# Altium PCB SPSU.PcbDoc
Units mil, origin at the board's own origin, x right, y up, seen from the top; angles counter-clockwise.
Board outline 1757.74 x 2141.82 mil, 2 copper layers (Top, Bottom); 44 components, 39 nets, 162 pads, 320 vias.
Unrouted connection lines stored in the file: 2.
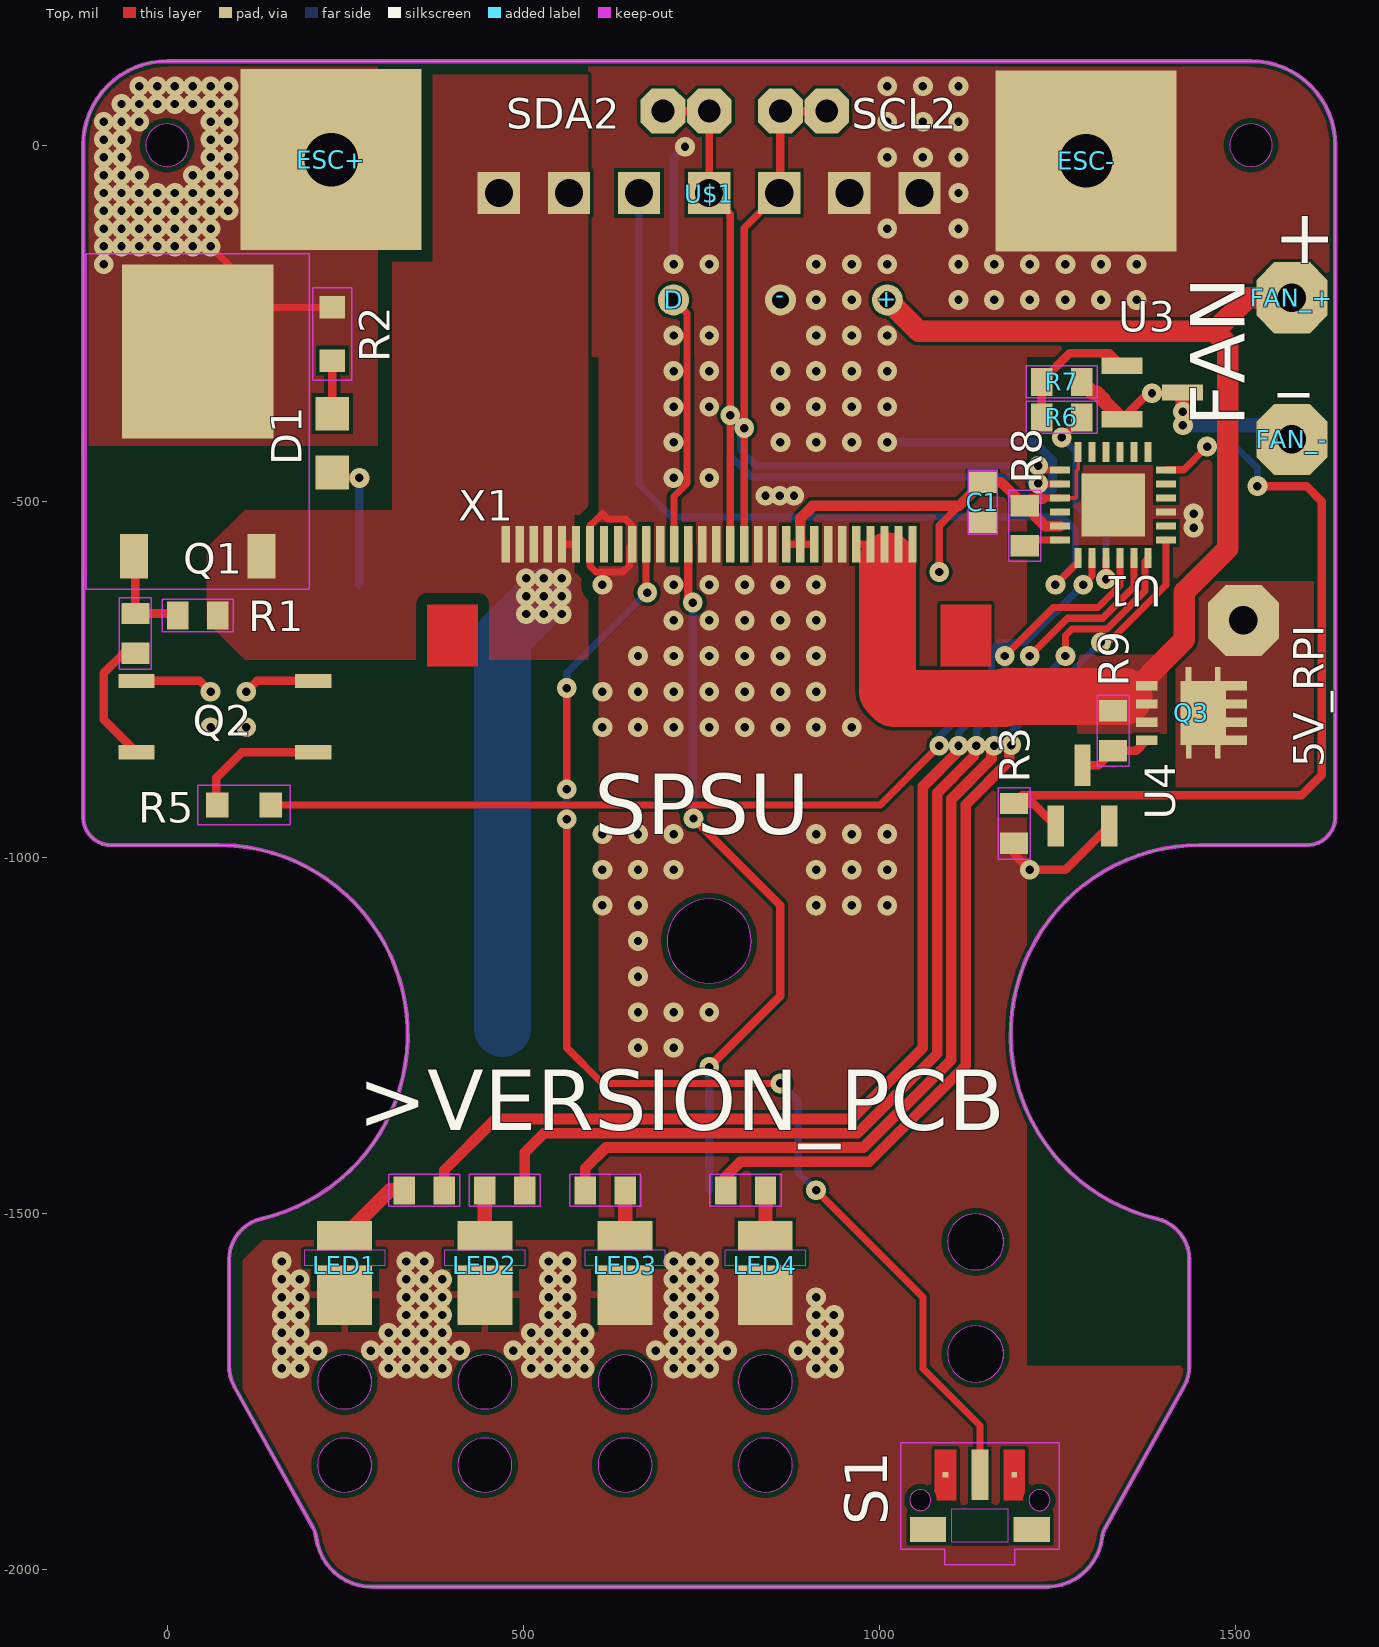
[diagram p0: Top view]
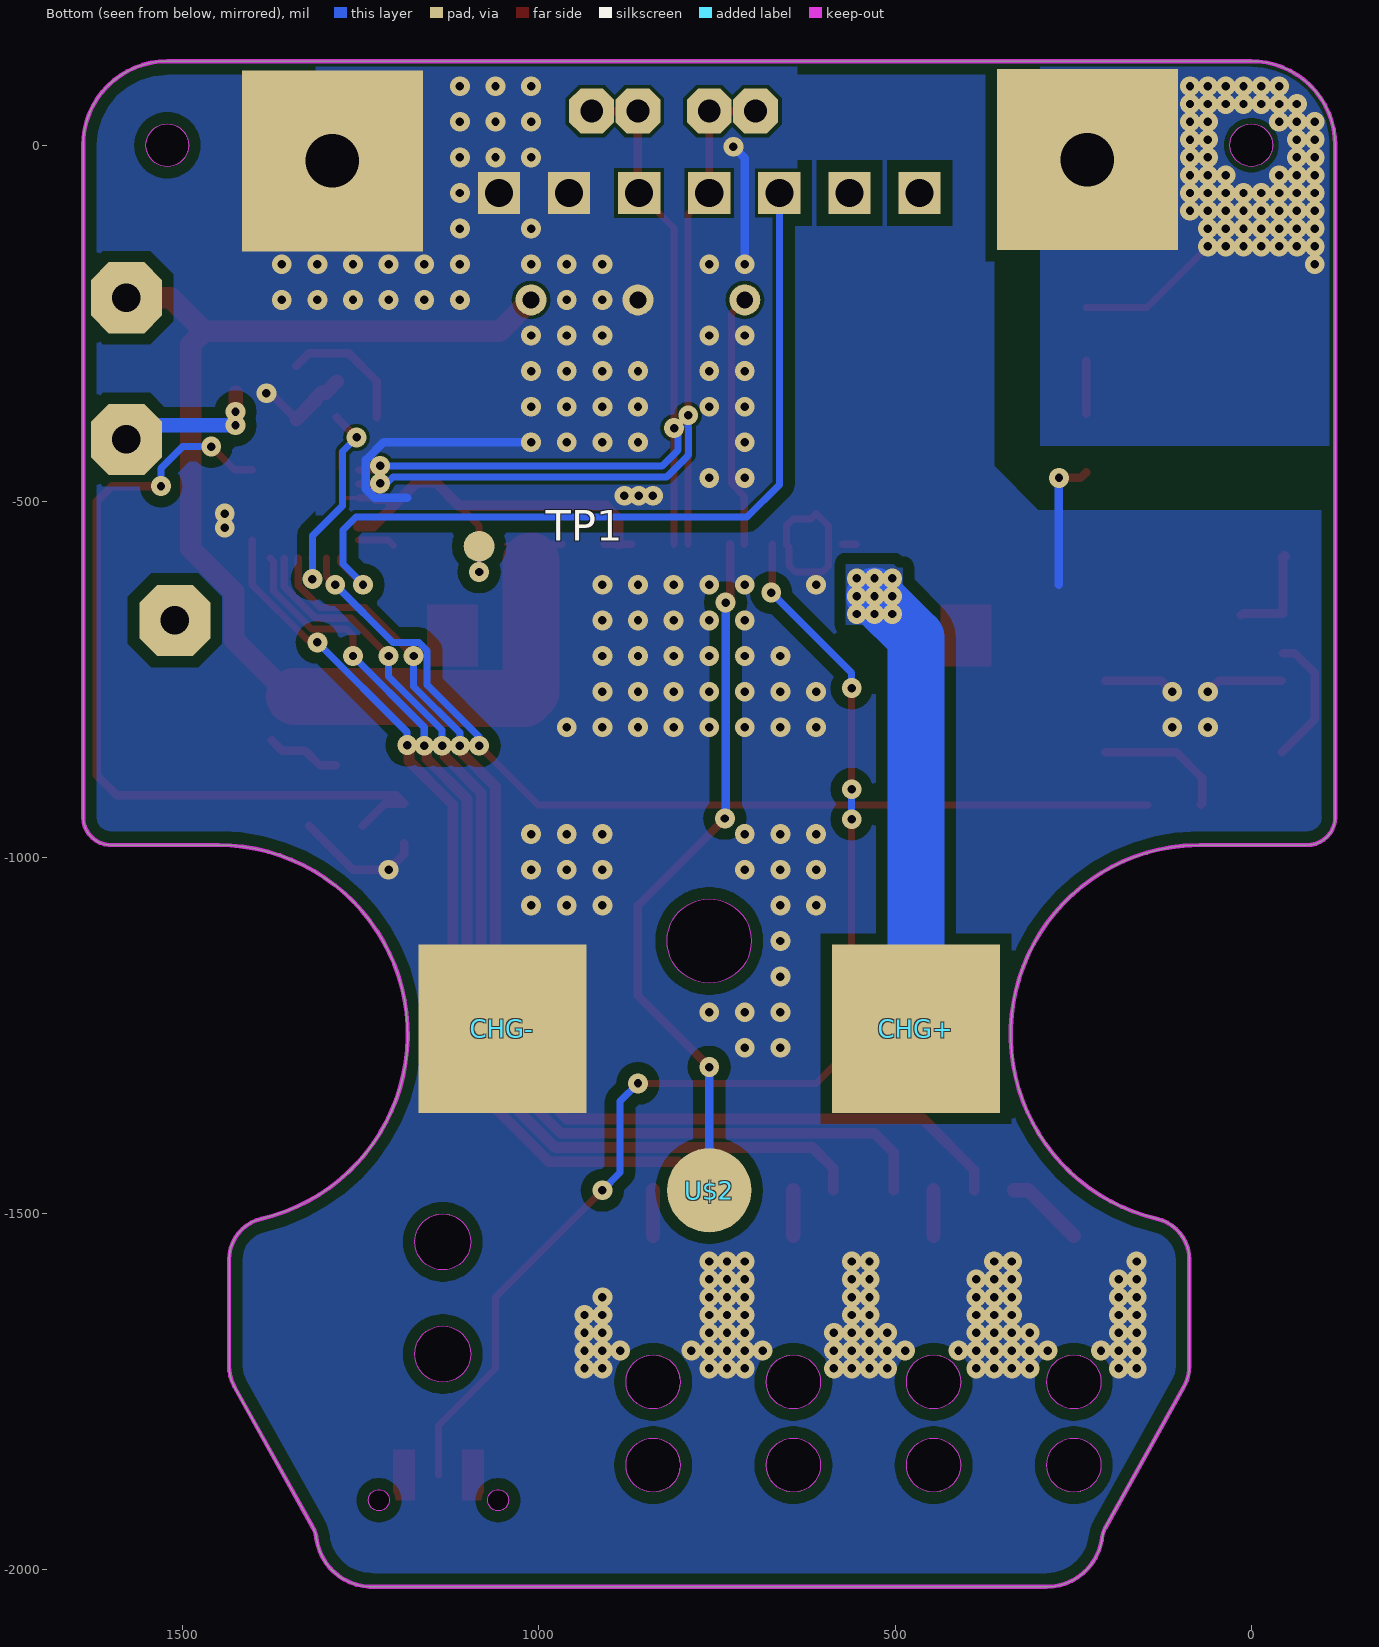
[diagram p1: Bottom view, seen from below]

## Layer stack, top to bottom
Top Solder: solder mask 0.4, Solder Resist, Dk 3.5
Top: signal copper 1.378
Dielectric 1: dielectric 12.6, FR-4, Dk 4.8
Bottom: signal copper 1.378
Bottom Solder: solder mask 0.4, Solder Resist, Dk 3.5

## Board outline
1313.4,-1950.24 1312.71,-1953.6 1312.52,-1954.94 cw(c1234.4,-1945.12) 1238.29,-2023.76 1234.39,-2023.86 287.67,-2023.86 cw(c287.67,-1945.12) 211.61,-1965.5 210.12,-1958.8 209.54,-1954.94 208.1,-1948.23 206.94,-1945 205.51,-1941.88 204.87,-1940.69 94.44,-1742.51 cw(c146.03,-1713.76) 86.97,-1713.76 86.97,-1564.54 cw(c146.02,-1564.54) 132.57,-1507.04 ccw(c72.05,-1248.28) 95.21,-983.54 72.05,-982.52 -78.47,-982.52 cw(c-78.47,-943.15) -117.84,-943.15 -117.84,-0.15 cw(c0.27,-0.14) -10.03,117.52 0.27,117.96 1521.79,117.96 cw(c1521.8,-0.15) 1639.46,10.15 1639.9,-0.15 1639.9,-943.15 cw(c1600.53,-943.15) 1603.97,-982.37 1600.53,-982.52 1450.01,-982.52 ccw(c1450.01,-1248.27) 1389.49,-1507.04 cw(c1376.04,-1564.54) 1435.09,-1564.54 1435.09,-1713.76 cw(c1376.03,-1713.76) 1427.62,-1742.51 1317.19,-1940.69 ccw(c1351.56,-1959.88) 1314.38,-1946.95
cut-out: 761.03,-1176.22 ccw(c761.03,-1117.17) 820.08,-1117.17 ccw(c761.03,-1117.17) 761.03,-1058.11 ccw(c761.03,-1117.17) 701.98,-1117.17 ccw(c761.03,-1117.17)
cut-out: 1135.05,-1578.89 ccw(c1135.05,-1539.52) 1174.42,-1539.52 ccw(c1135.05,-1539.52) 1135.05,-1500.15 ccw(c1135.05,-1539.52) 1095.68,-1539.52 ccw(c1135.05,-1539.52)
cut-out: 1135.05,-1736.37 ccw(c1135.05,-1697) 1174.42,-1697 ccw(c1135.05,-1697) 1135.05,-1657.63 ccw(c1135.05,-1697) 1095.68,-1697 ccw(c1135.05,-1697)
cut-out: 642.92,-1774.06 ccw(c642.92,-1736.07) 680.91,-1736.07 ccw(c642.92,-1736.07) 642.92,-1698.08 ccw(c642.92,-1736.07) 604.93,-1736.07 ccw(c642.92,-1736.07)
cut-out: 446.07,-1890.99 ccw(c446.07,-1853) 484.06,-1853 ccw(c446.07,-1853) 446.07,-1815.01 ccw(c446.07,-1853) 408.08,-1853 ccw(c446.07,-1853)
cut-out: 642.92,-1890.99 ccw(c642.92,-1853) 680.91,-1853 ccw(c642.92,-1853) 642.92,-1815.01 ccw(c642.92,-1853) 604.93,-1853 ccw(c642.92,-1853)
cut-out: 839.77,-1774.06 ccw(c839.77,-1736.07) 877.76,-1736.07 ccw(c839.77,-1736.07) 839.77,-1698.08 ccw(c839.77,-1736.07) 801.78,-1736.07 ccw(c839.77,-1736.07)
cut-out: 839.77,-1890.99 ccw(c839.77,-1853) 877.76,-1853 ccw(c839.77,-1853) 839.77,-1815.01 ccw(c839.77,-1853) 801.78,-1853 ccw(c839.77,-1853)
cut-out: 249.22,-1774.06 ccw(c249.22,-1736.07) 287.21,-1736.07 ccw(c249.22,-1736.07) 249.22,-1698.08 ccw(c249.22,-1736.07) 211.23,-1736.07 ccw(c249.22,-1736.07)
cut-out: 446.07,-1774.06 ccw(c446.07,-1736.07) 484.06,-1736.07 ccw(c446.07,-1736.07) 446.07,-1698.08 ccw(c446.07,-1736.07) 408.08,-1736.07 ccw(c446.07,-1736.07)
cut-out: 249.22,-1890.99 ccw(c249.22,-1853) 287.21,-1853 ccw(c249.22,-1853) 249.22,-1815.01 ccw(c249.22,-1853) 211.23,-1853 ccw(c249.22,-1853)
cut-out: 1521.68,-30.11 ccw(c1521.68,-0.11) 1551.68,-0.11 ccw(c1521.68,-0.11) 1521.68,29.89 ccw(c1521.68,-0.11) 1491.68,-0.11 ccw(c1521.68,-0.11)
cut-out: 0,-30 ccw(c0,0) 30,0 ccw(c0,0) 0,30 ccw(c0,0) -30,0 ccw(c0,0)
cut-out: 1224.69,-1916.93 ccw(c1224.69,-1902.17) 1239.46,-1902.17 ccw(c1224.69,-1902.17) 1224.69,-1887.4 ccw(c1224.69,-1902.17) 1209.93,-1902.17 ccw(c1224.69,-1902.17)
cut-out: 1057.37,-1916.93 ccw(c1057.37,-1902.17) 1072.13,-1902.17 ccw(c1057.37,-1902.17) 1057.37,-1887.4 ccw(c1057.37,-1902.17) 1042.61,-1902.17 ccw(c1057.37,-1902.17)

## Design rules (kind name [scope] priority, off if disabled: settings)
BoardOutlineClearance mdCopperDimension [All] p1: gap=10 ignorepadtopadclearanceinfootprint=FALSE except(0: Arc-SplitContinuation Track-SplitContinuation SMDPad-SplitContinuation THPad-SplitContinuation Via-SplitContinuation Fill-SplitContinuation Poly-SplitContinuation Region-SplitContinuation Text-SplitContinuation; 7.87: Poly-OutlineEdge Poly-CavityEdge Poly-CutoutEdge Poly-SplitBarrior)
Clearance Clearance_for_PolygonClass_Isolate_16 [InPolygonClass('Isolate_16') vs IsArc Or IsTrack Or IsPad Or IsVia Or IsFill Or IsRegion Or IsText] p1: gap=16 ignorepadtopadclearanceinfootprint=FALSE
Clearance "Clearance (Same Net)" [All] p2: gap=5 ignorepadtopadclearanceinfootprint=FALSE
Clearance [All] p3: gap=5 ignorepadtopadclearanceinfootprint=FALSE
HoleSize [All] p1: absolutevalues=TRUE maxlimit=100000 minlimit=11.81 maxpercent=80.000 minpercent=20.000
HoleToHoleClearance mdDrill [All] p1: gap=6 allowstackedmicrovias=TRUE
MinimumSolderMaskSliver [All] p1 off: minsoldermaskwidth=10
PasteMaskExpansion Expansion_SMDPaste_OFF [InPadClass('SMDPaste_OFF')] p1: expansion=0
PasteMaskExpansion mlMinCreamFrame [All] p2: expansion=0
PolygonConnect PolygonConnect_For_PolygonThermal_ON_Width100000_Gap100000 [InPolygonClass('PolygonThermal_ON_Width100000_Gap100000') vs Not IsVia] p1: connectstyle=Relief reliefconductorwidth=10 reliefentries=4 polygonreliefangle="90 Angle" airgapwidth=10
PolygonConnect PolygonConnect_For_PolygonThermal_OFF [InPolygonClass('PolygonThermal_OFF')] p2: connectstyle=Direct reliefconductorwidth=10 reliefentries=4 polygonreliefangle="90 Angle" airgapwidth=10
PolygonConnect ThermalVias [IsVia] p3: connectstyle=Direct reliefconductorwidth=10 reliefentries=4 polygonreliefangle="90 Angle" airgapwidth=10
PolygonConnect [All] p4: connectstyle=Relief reliefconductorwidth=10 reliefentries=4 polygonreliefangle="90 Angle" airgapwidth=10
RoutingVias [All] p1: holewidth=11.81 width=17.81 viastyle="Through Hole" minholewidth=11.81 minwidth=17.81 maxholewidth=100 maxwidth=100
SolderMaskExpansion Expansion_SMDSolder_OFF [InPadClass('SMDSolder_OFF')] p1: expansion=0 istentingtop=FALSE
SolderMaskExpansion mlMinStopFrame [All] p2: expansion=4 istentingtop=FALSE
Width [All] p1: maxlimit=10 minlimit=5 preferedwidth=5
26 further rules are at their usual default settings.

## Classes and differential pairs
polygon class PolygonThermal_ON_Width100000_Gap100000: Polygon_3_Net_+12V Polygon_4_Net_0V
polygon class PolygonThermal_OFF: Polygon_1_Net_0V Polygon_1_Net_+5V Polygon_1_Net_+5V_RPI Polygon_1_Net_+12V Polygon_1_Net_ESC_+ Polygon_2_Net_0V Polygon_2_Net_+12V Polygon_2_Net_ESC_+ Polygon_3_Net_0V Polygon_5_Net_0V Polygon_6_Net_0V
polygon class Isolate_16: Polygon_1_Net_+12V Polygon_2_Net_0V Polygon_2_Net_+12V
pad class SMDSolder_OFF: S1-1 S1-3 X1-1 X1-2 X1-3 X1-4 X1-5 X1-6 X1-7 X1-8 X1-9 X1-10 X1-11 X1-12 X1-13 X1-14 X1-15 X1-16 X1-17 X1-18 X1-19 X1-20 X1-21 X1-22 X1-23 X1-24 X1-25 X1-26 X1-27 X1-28 X1-29 X1-30
pad class SMDPaste_OFF: S1-1 S1-3 TP1-TP X1-1 X1-2 X1-3 X1-4 X1-5 X1-6 X1-7 X1-8 X1-9 X1-10 X1-11 X1-12 X1-13 X1-14 X1-15 X1-16 X1-17 X1-18 X1-19 X1-20 X1-21 X1-22 X1-23 X1-24 X1-25 X1-26 X1-27 X1-28 X1-29 X1-30

## Components (designator, comment, footprint, x,y, rotation, side; value= is the part's Value field where it differs from the comment)
5V_RPI "WIREPAD2,54/1,0" 2,54/1,0 1511.03,-667.17 r90 top
+ "" TH-0.75/0.6 1011.03,-217.17 r0 top
- "" TH-0.75/0.6 861.03,-217.17 r0 top
C1 "100nF" C0603 1145.03,-501.32 r90 top
CHG+ "" SMT-PAD_SQ6MM 470.75,-1240.3 r180 bottom
CHG- "" SMT-PAD_SQ6MM 1051.31,-1240.3 r180 bottom
D "" TH-0.75/0.6 711.03,-217.17 r0 top
D1 "" CHIPLED_0805 232.03,-418.17 r180 top
ESC+ "" ESC 230.28,-20.42 r180 top
ESC- "" ESC 1290.03,-22.17 r0 top
FAN_+ "WIREPAD2,54/1,0" 2,54/1,0 1579.03,-214.17 r0 top
FAN_- "WIREPAD2,54/1,0" 2,54/1,0 1579.03,-413.17 r0 top
LED1 "JE2835AWTLED_JE2835_CRW-L" LED_JE2835_CRW-L 249.22,-1582.92 r90 top
LED2 "JE2835AWTLED_JE2835_CRW-L" LED_JE2835_CRW-L 446.07,-1582.92 r90 top
LED3 "JE2835AWTLED_JE2835_CRW-L" LED_JE2835_CRW-L 642.92,-1582.92 r90 top
LED4 "JE2835AWTLED_JE2835_CRW-L" LED_JE2835_CRW-L 839.77,-1582.92 r90 top
Q1 "FDD4141TO252" TO252 43.03,-388.17 r0 top
Q2 "EL357N" EL357N(C)(TA)-VG_EVE-L 81.03,-802.17 r180 top
Q3 "" POWERDI3333-8_3P3X3P3_DIO 1438.03,-797.17 r0 top
R1 "100k" R0603#1 43.03,-660.17 r0 top
R2 "150" R0603#2 232.03,-265.17 r270 top
R3 "100k" R0603#1 1189.03,-952.17 r90 top
R4 "4k7" R0603#1 -44.47,-685.42 r270 top
R5 "200" R0603#2 108.03,-926.17 r180 top
R6 "4k7" R0603#1 1256.03,-382.17 r0 top
R7 "100k" R0603#1 1256.03,-332.17 r180 top
R8 "100k" R0603#1 1204.03,-534.17 r270 top
R9 "100k" R0603#1 1328.03,-822.17 r90 top
R10 "150R" R0603#1 361.03,-1467.17 r0 top
R11 "150R" R0603#1 474.03,-1467.17 r0 top
R12 "150R" R0603#1 615.03,-1467.17 r180 top
R13 "150R" R0603#1 812.03,-1467.17 r180 top
S1 "TL3340AF160QG" SW_TL3340AF160QG 1141.03,-1902.17 r0 top
SCL1 "" 1,6/0,8 861.03,47.83 r0 top
SCL2 "" 1,6/0,8 926.03,47.83 r0 top
SDA1 "" 1,6/0,8 696.03,47.83 r0 top
SDA2 "" 1,6/0,8 761.03,47.83 r0 top
TP1 "TPTP11R" TP11R 1084.03,-563.17 r180 bottom
U1 "PCAL6416AHF,128HWQFN24_PCAL_NXP-L" HWQFN24_PCAL_NXP-L 1328.03,-505.17 r90 top
U3 "2N7002,215TO-236AB_NEX-M" TO-236AB_NEX-M 1383.03,-347.17 r270 top
U4 "" TO-236AB_NEX-M 1285.03,-913.17 r0 top
U$1 "" BATT_CON_THT 761.03,-67.17 r180 top
U$2 "" SMT-PAD_R3MM 761.03,-1467.17 r180 bottom
X1 "FH12-30S-0.5SH" FH12-30S-0.5SH 761.03,-688.17 r0 top

## Footprints (in the part's own frame and the unit in brackets; to place one, negate y for a bottom-side part, rotate by r counter-clockwise, add the part's x,y. Pads: shape width x height; smd on the part's side, far side on the other; paste and mask are expansions set on the pad)
1,6/0,8 [mil] "1,6/0,8"
  oct 63x63 / inner round 58.2 / far side oct 63x63 hole 32: 1(0,0)
2,54/1,0 [mil] "2,54/1,0"
  oct 100x100 / inner round 92.39 / far side oct 100x100 hole 40: 1(0,0)
BATT_CON_THT [mm] "BATT_CON_THT"
  rect 1.508x1.508 / inner round 1.393 / far side rect 1.508x1.508 hole 1: P$1(-7.498,0) P$2(-4.998,0) P$3(-2.498,0) P$4(0.002,0) P$5(2.502,0) P$6(5.002,0) P$7(7.502,0)
C0603 [mil] "C0603"
  rect 30x39.4 smd: 1(-28,0) 2(28,0)
  Top keep-out lines w2: -44.96,20.56 -44.96,-20.56 44.96,-20.56 44.96,20.56 -44.96,20.56
CHIPLED_0805 [mil] "CHIPLED_0805"
  rect 47.24x47.24 smd: A(0,-41.34) C(0,41.34)
EL357N(C)(TA)-VG_EVE-L [mil] "EL357N(C)(TA)-VG_EVE-L"
  rect 51x20 smd: 1(-124,50) 2(-124,-50) 3(124,-50) 4(124,50)
ESC [mil] "ESC"
  rect 254x254 / inner round 234.67 / far side rect 254x254 hole 75: P$1(0,0)
FH12-30S-0.5SH [mil] "FH12-30S-0.5SH"
  rect 11.81x51.18 smd paste+0 mask+0: 1(-285.43,127.95) 2(-265.75,127.95) 3(-246.06,127.95) 4(-226.38,127.95) 5(-206.69,127.95) 6(-187.01,127.95) 7(-167.32,127.95) 8(-147.64,127.95) 9(-127.95,127.95) 10(-108.27,127.95) 11(-88.58,127.95) 12(-68.9,127.95) 13(-49.21,127.95) 14(-29.53,127.95) 15(-9.84,127.95) 16(9.84,127.95) 17(29.53,127.95) 18(49.21,127.95) 19(68.9,127.95) 20(88.58,127.95) 21(108.27,127.95) 22(127.95,127.95) 23(147.64,127.95) 24(167.32,127.95) 25(187.01,127.95) 26(206.69,127.95) 27(226.38,127.95) 28(246.06,127.95) 29(265.75,127.95) 30(285.43,127.95)
  Top region: -324.8,43.31 -324.8,-43.31 -395.67,-43.31 -395.67,43.31
  Top region: 395.67,43.31 395.67,-43.31 324.8,-43.31 324.8,43.31
HWQFN24_PCAL_NXP-L [mil] "HWQFN24_PCAL_NXP-L"
  rect 27.87x10.03 smd: 1(-74.44,49.23) 2(-74.44,29.53) 3(-74.44,9.85) 4(-74.44,-9.85) 5(-74.44,-29.53) 6(-74.44,-49.23) 13(74.44,-49.23) 14(74.44,-29.53) 15(74.44,-9.85) 16(74.44,9.85) 17(74.44,29.53) 18(74.44,49.23)
  rect 10.03x27.87 smd: 7(-49.23,-74.44) 8(-29.53,-74.44) 9(-9.85,-74.44) 10(9.85,-74.44) 11(29.53,-74.44) 12(49.23,-74.44) 19(49.23,74.44) 20(29.53,74.44) 21(9.85,74.44) 22(-9.85,74.44) 23(-29.53,74.44) 24(-49.23,74.44)
  rect 89x89 smd: 25(0,0)
LED_JE2835_CRW-L [mil] "LED_JE2835_CRW-L"
  rect 84x77 smd: 1(-31,0)
  rect 42x77 smd: 2(52,0)
  Top keep-out region: 10,56 32,56 32,-56 10,-56
  Top keep-out region: 10,56 32,56 32,-56 10,-56
POWERDI3333-8_3P3X3P3_DIO [mil] "POWERDI3333-8_3P3X3P3_DIO"
  rect 30x13 smd: 1(-63,38.39) 2(-63,12.8) 3(-63,-12.8) 4(-63,-38.39) 5(63,-38.39) 6(63,-12.8) 7(63,12.8) 8(63,38.39)
  rect 64x90 smd: 9(16.35,0)
  rect 8x20 smd: 10(-4.1,54.9) 11(37,54.9) 12(-4,-54.1) 13(37,-54.1)
R0603#1 [mil] "R0603"
  rect 30x39.4 smd: 1(-28,0) 2(28,0)
  Top keep-out lines w2: -49.96,-22.56 -49.96,22.56 49.96,22.56 49.96,-22.56 -49.96,-22.56
R0603#2 [mil] "R0603"
  rect 31.5x35.43 smd: 1(-37.4,0) 2(37.4,0)
  Top keep-out lines w2: 64.96,-27.56 -64.96,-27.56 -64.96,27.56 64.96,27.56 64.96,-27.56
SMT-PAD_R3MM [mm] "SMT-PAD_R3MM"
  rrect100% 3x3 smd: P$1(0,0)
SMT-PAD_SQ6MM [mm] "SMT-PAD_SQ6MM"
  rect 6x6 smd: P$1(0,0)
SW_TL3340AF160QG [mil] "SW_TL3340AF160QG"
  rect 7.87x7.87 smd paste+0 mask+0: 1(-48.23,35.43) 3(48.23,35.43)
  rect 23.62x70.87 smd: 2(0,35.43)
  rect 51.18x35.43 smd: S1(-72.83,-41.34) S2(72.83,-41.34)
  Top region: 63.19,71.06 33.27,71.06 33.27,-0.19 60.24,-0.19 60.22,0.34 60.24,1.05 60.29,1.74 60.37,2.43 60.42,2.79 60.45,3.14 60.55,3.84 60.67,4.54 60.83,5.22 60.92,5.57 61.02,5.99 61.24,6.83 61.49,7.65 61.8,8.47 61.97,8.88 62.09,9.19 62.36,9.83 62.65,10.44 62.98,11.04 63.19,11.39 63.19,11.81
  Top region: -63.18,71.06 -33.26,71.06 -33.26,-0.19 -60.24,-0.19 -60.22,0.34 -60.24,1.05 -60.29,1.74 -60.37,2.43 -60.42,2.79 -60.45,3.14 -60.55,3.84 -60.67,4.54 -60.83,5.22 -60.92,5.57 -61.02,5.99 -61.24,6.83 -61.49,7.65 -61.8,8.47 -61.97,8.88 -62.09,9.19 -62.36,9.83 -62.65,10.44 -62.98,11.04 -63.18,11.39 -63.18,11.81
  Top keep-out region: -39.37,-59.06 -39.37,-11.81 39.37,-11.81 39.37,-59.06
  Top keep-out region: -39.37,-59.06 -39.37,-11.81 39.37,-11.81 39.37,-59.06
  Top keep-out lines w1.97: -111.22,-68.9 -111.22,80.71 111.22,80.71 111.22,-68.9 49.21,-68.9 49.21,-90.55 -49.21,-90.55 -49.21,-68.9 -111.22,-68.9
TH-0.75/0.6 [mil] "TH-0.75/0.6"
  round 43.62 hole 23.62: P$2(0,0)
TO252 [mm] "TO252"
  rect 1x1.6 smd: 1(-2.28,-4.8) 2(2.28,-4.8)
  rect 5.4x6.2 smd: 3(0,2.5)
  Top keep-out lines w0.051: -3.973,-5.983 -3.973,5.983 3.973,5.983 3.973,-5.983 -3.973,-5.983
TO-236AB_NEX-M [mil] "TO-236AB_NEX-M"
  rect 23x58 smd: 1(-37.5,-42.5) 2(37.5,-42.5) 3(0,42.5)
TP11R [mil] "TP11R"
  rrect100% 43.31x43.31 smd paste+0: TP(0,0)

## Part data
5V_RPI FAN_+ FAN_-: library part 2,54/1,0, PackageName=2,54/1,0
+ - D: library part TH-0.75/0.6, PackageName=TH-0.75/0.6
C1: library part C0603, PackageName=C0603
CHG+ CHG-: library part SMT-PAD_SQ6MM, PackageName=SMT-PAD_SQ6MM
D1: library part CHIPLED_0805, PackageName=CHIPLED_0805
ESC+ ESC-: library part ESC, PackageName=ESC
LED1 LED2 LED3 LED4: library part LED_JE2835_CRW-L, PackageName=LED_JE2835_CRW-L
Q1: library part TO252, PackageName=TO252
Q2: library part EL357N(C)(TA)-VG_EVE-L, PackageName=EL357N(C)(TA)-VG_EVE-L
Q3: library part POWERDI3333-8_3P3X3P3_DIO, PackageName=POWERDI3333-8_3P3X3P3_DIO
R1 R2 R3 R4 R5 R6 R7 R8 R9 R10 R11 R12 R13: library part R0603, PackageName=R0603
S1: library part SW_TL3340AF160QG, PackageName=SW_TL3340AF160QG
SCL1 SCL2 SDA1 SDA2: library part 1,6/0,8, PackageName=1,6/0,8
TP1: library part TP11R, PackageName=TP11R
U1: library part HWQFN24_PCAL_NXP-L, PackageName=HWQFN24_PCAL_NXP-L
U3 U4: library part TO-236AB_NEX-M, PackageName=TO-236AB_NEX-M
U$1: library part BATT_CON_THT, PackageName=BATT_CON_THT
U$2: library part SMT-PAD_R3MM, PackageName=SMT-PAD_R3MM
X1: PackageName=FH12-30S-0.5SH

## Free pads (board coordinates)
  round 75.98 hole 75.98 unplated: MH1(839.77,-1853) MH2(839.77,-1736.07) MH3(249.22,-1736.07) MH4(249.22,-1853) MH5(446.07,-1736.07) MH6(642.92,-1853) MH7(642.92,-1736.07) MH8(446.07,-1853)
  round 29.53 hole 29.53 unplated: MH1(1057.37,-1902.17) MH2(1224.69,-1902.17)
  round 78.74 hole 78.74 unplated: MH9(1135.05,-1539.52) MH10(1135.05,-1697)
  round 60 hole 60 unplated: MH11(0,0) MH12(1521.68,-0.11)
  round 118.11 hole 118.11 unplated: MH13(761.03,-1117.17)

## Via types
v1: diameter 27.81/27.81 (per signal layer), hole 11.81, Top to Bottom, 320 vias

## Nets (pads, with @x,y where several pads share a name; then routed paths per layer and width w, separated by ;. In a path a pad name is that pad's centre, name@x,y a point inside that pad or via, vN(x,y) a via of type N, cw(c..) or ccw(c..) an arc to the next point about the centre after c; other vN are vias at no path point)
0V: -.P$2 C1.1 CHG-.P$1 D1.C ESC-.P$1 LED1.1 LED2.1 LED3.1 LED4.1 Q2.2 Q2.3 R3.1 R7.1 S1.1 S1.3 U1.9 U1.25 U3.2 U4.2 U$1.P$1 U$1.P$2 X1.7 X1.10 X1.12 X1.15 X1.16 X1.19 X1.20 X1.24 X1.25 | length 1489
  Top w10: 593.71,-590.85 602.03,-599.17 639.76,-599.17 648.98,-589.95 648.98,-564 X1.10 652.76,-534.26 643.12,-524.63 618.49,-524.63 611.03,-517.17 603.57,-524.63 603.34,-524.63 593.71,-534.26 X1.7 593.71,-590.85
  Top w12: Q2.3 46.03,-752.17 v1(61.03,-767.17) ; v1(111.03,-767.17) 126.03,-752.17 Q2.2 ; D1.C 239.69,-467.17 v1(270.03,-467.17) ; R3.1 1189.03,-995.17 v1(1211.03,-1017.17) 1261.03,-1017.17 U4.2 ; U3.2 1377.03,-348.17 v1(1382.62,-348.17)
  Top w20: R7.1 1299.33,-347.47 1305.24,-347.47 1314.03,-356.26 1314.03,-358.17 U3.2
  Bottom w12: 270.03,-617.17 v1(270.03,-467.17) ; v1(711.03,-167.17) 711.03,-18.17 v1(727.03,-2.17) ; v1(1011.03,-417.17) 1218.18,-417.17 1242.94,-441.92 1242.94,-483.1 1231.28,-494.76 1184.62,-494.76
  other v1: 161.03,-1717.17 186.03,-1717.17 311.03,-1717.17 336.03,-1717.17 361.03,-1717.17 386.03,-1717.17 511.03,-1717.17 536.03,-1717.17 561.03,-1717.17 586.03,-1717.17 711.03,-1717.17 736.03,-1717.17 761.03,-1717.17 911.03,-1717.17 936.03,-1717.17 161.03,-1692.17 186.03,-1692.17 211.03,-1692.17 286.03,-1692.17 311.03,-1692.17 336.03,-1692.17 361.03,-1692.17 386.03,-1692.17 411.03,-1692.17 486.03,-1692.17 511.03,-1692.17 536.03,-1692.17 561.03,-1692.17 586.03,-1692.17 686.03,-1692.17 711.03,-1692.17 736.03,-1692.17 761.03,-1692.17 786.03,-1692.17 886.03,-1692.17 911.03,-1692.17 936.03,-1692.17 161.03,-1667.17 186.03,-1667.17 311.03,-1667.17 336.03,-1667.17 361.03,-1667.17 386.03,-1667.17 511.03,-1667.17 536.03,-1667.17 561.03,-1667.17 586.03,-1667.17 711.03,-1667.17 736.03,-1667.17 761.03,-1667.17 911.03,-1667.17 936.03,-1667.17 161.03,-1642.17 186.03,-1642.17 336.03,-1642.17 361.03,-1642.17 386.03,-1642.17 536.03,-1642.17 561.03,-1642.17 711.03,-1642.17 736.03,-1642.17 761.03,-1642.17 911.03,-1642.17 936.03,-1642.17 161.03,-1617.17 186.03,-1617.17 336.03,-1617.17 361.03,-1617.17 386.03,-1617.17 536.03,-1617.17 561.03,-1617.17 711.03,-1617.17 736.03,-1617.17 761.03,-1617.17 911.03,-1617.17 161.03,-1592.17 186.03,-1592.17 336.03,-1592.17 361.03,-1592.17 386.03,-1592.17 536.03,-1592.17 561.03,-1592.17 711.03,-1592.17 736.03,-1592.17 761.03,-1592.17 161.03,-1567.17 336.03,-1567.17 361.03,-1567.17 536.03,-1567.17 561.03,-1567.17 711.03,-1567.17 736.03,-1567.17 761.03,-1567.17 661.03,-1267.17 711.03,-1267.17 661.03,-1217.17 711.03,-1217.17 761.03,-1217.17 661.03,-1167.17 661.03,-1117.17 611.03,-1067.17 661.03,-1067.17 911.03,-1067.17 961.03,-1067.17 1011.03,-1067.17 611.03,-1017.17 661.03,-1017.17 711.03,-1017.17 911.03,-1017.17 961.03,-1017.17 1011.03,-1017.17 611.03,-967.17 661.03,-967.17 711.03,-967.17 911.03,-967.17 961.03,-967.17 1011.03,-967.17 61.03,-817.17 111.03,-817.17 611.03,-817.17 661.03,-817.17 711.03,-817.17 761.03,-817.17 811.03,-817.17 861.03,-817.17 911.03,-817.17 961.03,-817.17 611.03,-767.17 661.03,-767.17 711.03,-767.17 761.03,-767.17 811.03,-767.17 861.03,-767.17 911.03,-767.17 661.03,-717.17 711.03,-717.17 761.03,-717.17 811.03,-717.17 861.03,-717.17 911.03,-717.17 711.03,-667.17 761.03,-667.17 811.03,-667.17 861.03,-667.17 911.03,-667.17 611.03,-617.17 711.03,-617.17 761.03,-617.17 811.03,-617.17 861.03,-617.17 911.03,-617.17 1441.03,-537.17 1441.03,-517.17 840.03,-492.17 860.03,-492.17 880.03,-492.17 711.03,-467.17 761.03,-467.17 711.03,-417.17 861.03,-417.17 911.03,-417.17 961.03,-417.17 711.03,-367.17 761.03,-367.17 861.03,-367.17 911.03,-367.17 961.03,-367.17 1011.03,-367.17 711.03,-317.17 761.03,-317.17 861.03,-317.17 911.03,-317.17 961.03,-317.17 1011.03,-317.17 711.03,-267.17 761.03,-267.17 911.03,-267.17 961.03,-267.17 1011.03,-267.17 911.03,-217.17 961.03,-217.17 1111.03,-217.17 1161.03,-217.17 1211.03,-217.17 1261.03,-217.17 1311.03,-217.17 1361.03,-217.17 761.03,-167.17 911.03,-167.17 961.03,-167.17 1011.03,-167.17 1111.03,-167.17 1161.03,-167.17 1211.03,-167.17 1261.03,-167.17 1311.03,-167.17 1361.03,-167.17 1011.03,-117.17 1111.03,-117.17 1111.03,-67.17 1011.03,-17.17 1061.03,-17.17 1111.03,-17.17 1011.03,32.83 1061.03,32.83 1111.03,32.83 1011.03,82.83 1061.03,82.83 1111.03,82.83
+5V: +.P$2 FAN_+.1 Q3.1 Q3.2 Q3.3 R9.2 X1.26 X1.27 X1.28 X1.29 X1.30 | length 1837.4
  Top w5: X1.27 X1.28 ; X1.29 X1.30
  Top w10: X1.26 X1.27 ; X1.28@1011.03,-583.84 1011.03,-564.15 X1.28 X1.29
  Top w30: +.P$2 1055.03,-261.17 1470.03,-261.17 ; R9.2 1428.03,-694.17 1428.03,-627.17 1489.03,-566.17 1489.03,-280.17 1470.03,-261.17 ; FAN_+.1 1517.03,-214.17 1470.03,-261.17
  Top w80: X1.28@1011.03,-583.84 1011.03,-767.17 1020.34,-776.48 1175.34,-776.48 1177.65,-774.17 1343.03,-774.17
+5V_RPI: 5V_RPI.1 Q3.5 Q3.6 Q3.7 Q3.8 Q3.9 Q3.10 Q3.11 Q3.12 Q3.13
+12V: CHG+.P$1 Q1.2 R1.2 U$1.P$6 U$1.P$7 X1.1 X1.2 X1.3 X1.4 X1.5 X1.6 | length 651
  Top w10: X1.5 X1.6
  Bottom w80: CHG+.P$1 470.75,-691.45 v1(529.03,-633.17)
  other v1: 504.03,-658.17 529.03,-658.17 554.03,-658.17 504.03,-633.17 554.03,-633.17 504.03,-608.17 529.03,-608.17 554.03,-608.17
DOCK-COMM: U$2.P$1 X1.14 | length 1002.6
  Top w12: X1.14 731.5,-635.64 v1(738.03,-642.17) ; v1(739.03,-945.17) 861.03,-1067.17 861.03,-1194.17 v1(761.03,-1294.17)
  Bottom w12: v1(738.03,-642.17) 738.03,-945.17 v1(739.03,-945.17) ; U$2.P$1 v1(761.03,-1294.17)
ESC_+: ESC+.P$1 Q1.3 R2.1 | length 206.5
  Top w10: v1(61.03,-142.17) 146.63,-227.77 R2.1
  other v1: -88.97,-167.17 -88.97,-142.17 -63.97,-142.17 -38.97,-142.17 -13.97,-142.17 11.03,-142.17 36.03,-142.17 -88.97,-117.17 -63.97,-117.17 -38.97,-117.17 -13.97,-117.17 11.03,-117.17 36.03,-117.17 61.03,-117.17 -88.97,-92.17 -63.97,-92.17 -38.97,-92.17 -13.97,-92.17 11.03,-92.17 36.03,-92.17 61.03,-92.17 86.03,-92.17 -88.97,-67.17 -63.97,-67.17 -38.97,-67.17 -13.97,-67.17 11.03,-67.17 36.03,-67.17 61.03,-67.17 86.03,-67.17 -88.97,-42.17 -63.97,-42.17 -38.97,-42.17 36.03,-42.17 61.03,-42.17 86.03,-42.17 -88.97,-17.17 -63.97,-17.17 61.03,-17.17 86.03,-17.17 -88.97,7.83 -63.97,7.83 61.03,7.83 86.03,7.83 -88.97,32.83 -63.97,32.83 -38.97,32.83 61.03,32.83 86.03,32.83 -63.97,57.83 -38.97,57.83 -13.97,57.83 11.03,57.83 36.03,57.83 61.03,57.83 86.03,57.83 -38.97,82.83 -13.97,82.83 11.03,82.83 36.03,82.83 61.03,82.83 86.03,82.83
IO_P0_0: U1.1 U$1.P$5 | length 1187.6
  Top w10: v1(1247.03,-617.17) 1278.81,-585.4 U1.1
  Bottom w10: U$1.P$5 662.52,-476.66 708.03,-522.17 1257.03,-522.17 1275.03,-540.17 1275.03,-588.17 1247.03,-616.17 v1(1247.03,-617.17)
IO_P0_1: R5.1 U1.2 | length 1346.9
  Top w10: R5.1 1001.03,-926.17 v1(1084.03,-843.17) ; v1(1286.03,-617.17) 1298.5,-604.7 U1.2
  Bottom w10: v1(1084.03,-843.17) 1084.03,-830.53 1157.12,-757.44 1157.12,-709.34 1168.2,-698.26 1204.94,-698.26 v1(1286.03,-617.17)
IO_P0_2: R6.2 U1.3 | length 294
  Top w10: v1(1318.03,-609.17) 1318.03,-579.76 U1.3
  Top w12: v1(1255.94,-410.17) 1256.03,-410.17 R6.2
  Bottom w10: v1(1255.94,-410.17) 1275.94,-430.17 1275.94,-506.17 1318.03,-548.26 v1(1318.03,-609.17)
IO_P0_3: U1.4 | length 1610.4
  Top w10: v1(1176.03,-717.17) 1244.03,-649.17 1307.03,-649.17 1337.88,-618.33 U1.4
  Top w15: 389.03,-1467.17 389.03,-1439.17 461.03,-1367.17 961.03,-1367.17 1061.03,-1267.17 1061.03,-900.17 1111.03,-850.17 v1(1111.03,-843.17)
  Bottom w10: v1(1111.03,-843.17) 1111.03,-824.74 1176.03,-759.74 v1(1176.03,-717.17)
IO_P0_4: U1.5 | length 1528.7
  Top w10: v1(1211.03,-717.17) 1264.03,-664.17 1313.24,-664.17 1357.56,-619.85 U1.5
  Top w15: 502.03,-1467.17 502.03,-1414.17 529.03,-1387.17 969.31,-1387.17 1081.03,-1275.45 1081.03,-909.45 1132.44,-858.05 1132.44,-846.76 v1(1136.03,-843.17)
  Bottom w10: v1(1136.03,-843.17) 1136.03,-820.96 1211.03,-745.96 v1(1211.03,-717.17)
IO_P0_5: U1.6 | length 1455.5
  Top w10: v1(1261.03,-717.17) 1261.03,-688.38 1270.24,-679.17 1319.46,-679.17 1372.58,-626.05 1372.58,-584.28 U1.6
  Top w15: 587.03,-1467.17 587.03,-1436.17 616.03,-1407.17 977.6,-1407.17 1101.03,-1283.74 1101.03,-917.74 1157.44,-861.33 1157.44,-846.76 v1(1161.03,-843.17)
  Bottom w10: v1(1161.03,-843.17) 1161.03,-817.17 v1(1261.03,-717.17)
IO_P0_6: U1.7 | length 1281.2
  Top w10: v1(1311.03,-698.08) 1314.94,-694.17 1325.67,-694.17 1402.47,-617.37 U1.7
  Top w15: 784.03,-1467.17 784.03,-1448.17 805.03,-1427.17 985.88,-1427.17 1121.03,-1292.02 1121.03,-926.02 1182.44,-864.62 1182.44,-844.76 v1(1185.03,-842.17)
  Bottom w10: v1(1185.03,-842.17) 1185.03,-824.08 v1(1311.03,-698.08)
IO_P0_7: U1.8
IO_P1_0: U1.10
IO_P1_1: U1.11
IO_P1_2: R3.2 U1.12 U4.1 | length 1183.5
  Top w10: U1.12 1402.79,-455.62 1427.58,-455.62 v1(1460.03,-423.17) ; v1@1530.03,-478.17 v1(1530.53,-478.67)
  Top w12: U4.1 1216.03,-924.17 R3.2 1200.53,-912.67 1592.53,-912.67 1621.03,-884.17 1621.03,-500.17 1599.53,-478.67 v1(1530.53,-478.67)
  Bottom w10: v1(1460.03,-423.17) 1500.03,-423.17 1530.53,-453.67 v1(1530.53,-478.67)
IO_P1_3: U1.13
IO_P1_4: U1.14
IO_P1_5: U1.15
IO_P1_6: U1.16
IO_P1_7: U1.17
N$1: Q1.1 R1.1 | length 141.8
  Top w12: Q1.1@-44.47,-579.41 -44.47,-657.42 12.28,-657.42 R1.1
  Top w15: Q1.1 Q1.1@-44.47,-579.41
N$2: D1.A R2.2 | length 74.3
  Top w12: D1.A R2.2
N$3: Q2.4 | length 186
  Top w12: -44.47,-713.42 -61.22,-713.42 -88.97,-741.17 -88.97,-806.17 Q2.4
N$4: Q2.1 R5.2 | length 189.6
  Top w12: R5.2 69.03,-924.57 69.03,-888.17 105.03,-852.17 Q2.1
N$5: R6.1 R7.2 U3.1 | length 186.9
  Top w12: R6.1 R7.2 1228.03,-331.17 1267.03,-292.17 1323.03,-292.17 U3.1
N$6: FAN_-.1 U3.3 | length 245.2
  Top w20: U3.3 v1@1425.53,-392.67 ; v1(1426.03,-393.17) v1@1425.53,-392.67 ; v1(1426.03,-374.17) 1426.03,-392.17 v1@1425.53,-392.67
  Bottom w20: v1(1426.03,-374.17) v1(1426.03,-393.17) 1559.03,-393.17 FAN_-.1
N$7: R8.2 U1.24 | length 52.8
  Top w10: R8.2 1211.81,-554.4 U1.24
N$8: Q3.4 R9.1 U4.3 | length 104.5
  Top w12: U4.3 1307.53,-870.67 R9.1 1360.42,-850.17 Q3.4
N$9: LED1.2 | length 110.2
  Top w20: LED1.2 312.97,-1467.17 333.03,-1467.17
N$10: LED2.2 | length 63.8
  Top w20: 446.03,-1467.17 446.03,-1530.88 LED2.2
N$11: LED3.2 | length 63.8
  Top w20: LED3.2 643.03,-1530.81 643.03,-1467.17
N$12: LED4.2 | length 63.9
  Top w20: LED4.2 840.03,-1530.66 840.03,-1467.17
N$13: D.P$2 X1.13 | length 358.4
  Top w10: D.P$2 729.94,-236.08 729.94,-475 711.82,-493.12 X1.13
SCL: SCL2.1 U1.19 U$1.P$3 X1.18 | length 1187.3
  Top w10: X1.18 v1(810.24,-397.17) 810.24,-116.3 U$1.P$3 ; v1(1223.03,-450.17) 1228.81,-455.95 U1.19
  Top w12: U$1.P$3 861.03,-65.51 861.03,47.83 SCL2.1
  Bottom w10: v1(810.24,-397.17) 805.03,-402.38 805.03,-428.17 827.03,-450.17 v1(1223.03,-450.17)
SDA: SDA2.1 U1.20 U$1.P$4 X1.17 | length 1224.1
  Top w10: SDA2.1 761.03,-67.09 U$1.P$4 U$1.P$4@790.56,-96.78 ; X1.17 v1(790.56,-379.17) U$1.P$4@790.56,-96.78 ; U$1.P$4@790.56,-96.7 U$1.P$4@790.56,-96.78 ; v1(1223.03,-474.85) 1223.81,-475.64 U1.20
  Top w12: 696.03,47.83 SDA2.1
  Bottom w10: 790.03,-435.17 791.53,-436.67 ; v1(790.56,-379.17) 790.56,-395.64 790.03,-396.17 790.03,-434.38 791.53,-435.88 791.53,-436.67 ; v1(1223.03,-474.85) 1214.03,-474.85 1205.03,-465.85 820.71,-465.85 791.53,-436.67
SW: S1.2 X1.11 | length 1740.7
  Top w10: v1(561.03,-946.17) 561.03,-1267.17 611.03,-1317.17 v1(861.03,-1317.17) ; v1(561.03,-904.17) v1(561.03,-762.17) ; X1.11 672.45,-626.59 v1(674.03,-628.17) ; v1(911.03,-1467.17) 1061.03,-1617.17 1061.03,-1717.17 1141.03,-1797.17 S1.2
  Bottom w10: v1(561.03,-946.17) v1(561.03,-904.17) ; v1(561.03,-762.17) 561.03,-741.17 v1(674.03,-628.17) ; v1(861.03,-1317.17) 886.03,-1342.17 886.03,-1442.17 v1(911.03,-1467.17)
VDD: C1.2 R8.1 TP1.TP U1.18 U1.21 U1.23 X1.21 X1.22 X1.23 | length 815.8
  Top w5: U1.21 1274.88,-495.33 1276.03,-494.17 1276.03,-457.56 1278.81,-454.79 U1.18
  Top w10: X1.21 X1.22 X1.23 ; v1(1084.03,-599.17) 1084.03,-534.32 C1.2 ; 1229.03,-496.26 1230.03,-495.26 1253.52,-495.26 U1.21
  Top w15: X1.22 888.98,-524.22 906.03,-507.17 906.03,-506.17 1112.18,-506.17 C1.2 1171.18,-473.32 R8.1 ; 1229.03,-496.26 1213.94,-496.26 R8.1 ; U1.23 1232.56,-534.7 R8.1
  Bottom w6: v1(1084.03,-599.17) TP1.TP
pads on no net: R4.1 R4.2 R10.1 R10.2 R11.1 R11.2 R12.1 R12.2 R13.1 R13.2 S1.S1 S1.S2 SCL1.1 SDA1.1 U1.22 X1.8 X1.9

## Polygon pours and split planes (outlines as drawn)
+5V_RPI on Top "Polygon_1_Net_+5V_RPI" (solid, remove dead copper, pour order 2): 1416.03,-612.17 1416.03,-922.17 1616.03,-922.17 1616.03,-612.17
ESC_+ on Top "Polygon_1_Net_ESC_+" (solid, remove dead copper, pour order 3): -193.97,137.83 296.03,137.83 296.03,-422.17 -193.97,-422.17
+12V on Top "Polygon_2_Net_+12V" (solid, remove dead copper, pour order 4): 316.03,157.83 316.03,-512.17 108.96,-512.17 56.03,-565.1 56.03,-669.24 108.96,-722.17 591.03,-722.17 591.03,157.83
+12V on Top "Polygon_1_Net_+12V" (solid, remove dead copper, pour order 7): 406.03,37.83 576.03,37.83 576.03,-272.17 468.96,-272.17 461.03,-264.24 461.03,-154.24 406.03,-99.24
+5V on Top "Polygon_1_Net_+5V" (solid, remove dead copper, pour order 1): 1278.03,-715.17 1403.03,-715.17 1403.03,-826.17 1278.03,-826.17
0V on Top "Polygon_6_Net_0V" (solid, remove dead copper, pour order 9): 1256.35,-411.17 1411.03,-411.17 1467.03,-411.17 1467.03,-623.17 1203.35,-623.17
0V on Top "Polygon_5_Net_0V" (solid, remove dead copper, pour order 11): 606.03,-165.17 606.03,-2190.17 1207.03,-2190.17 1207.03,-165.17
0V on Top "Polygon_4_Net_0V" (solid, remove dead copper, pour order 6): 106.03,-1565.1 133.96,-1537.17 888.1,-1537.17 966.03,-1615.1 966.03,-1687.1 992.1,-1713.17 1595.03,-1713.17 1595.03,-2072.17 106.03,-2072.17
0V on Top "Polygon_1_Net_0V" (solid, remove dead copper, pour order 10): 591.03,137.83 591.03,-137.17 571.03,-137.17 571.03,-297.17 1666.03,-297.17 1666.03,137.83
ESC_+ on Bottom "Polygon_2_Net_ESC_+" (solid, remove dead copper, pour order 5): -243.97,187.83 296.03,187.83 296.03,-422.17 -143.97,-422.17 -143.97,-372.17 -243.97,-372.17
+12V on Bottom "Polygon_3_Net_+12V" (solid, remove dead copper, pour order 0): 489.03,-593.17 489.03,-673.17 569.03,-673.17 569.03,-588.17 501.96,-588.17 496.96,-593.17
0V on Bottom "Polygon_3_Net_0V" (solid, remove dead copper, pour order 8): 637.53,135.33 637.53,-519.67 1313.53,-519.67 1313.53,135.33
0V on Bottom "Polygon_2_Net_0V" (solid, remove dead copper, pour order 12): 361.03,187.83 361.03,-450.1 298.96,-512.17 -193.97,-512.17 -193.97,-2172.17 1666.03,-2172.17 1666.03,187.83

## Keep-outs
Keep-Out Layer:
  the board outline again, w6

## Silkscreen, mask and mechanical layers (free items; w line width, h text height)
Top Overlay:
  text "+" at 1553.42,-165.53 h76.5
  text "_" at 1559.69,-334.13 h63.75
  text "FAN" at 1512.51,-395.1 h76.5 r90
  text "SPSU" at 599.45,-967.17 h85
  text ">VERSION_PCB" at 267.72,-1383.17 h85
Dimension:
  the board outline again, w6
tPlace:
  drawing of 1847 lines, arcs and shapes, not listed
Document:
  circle w6: c1521.79,-0.15 r88.58
  circle w6: c0.27,-0.15 r88.58

## Text inside footprints (layer, text, board x,y; h text height)
LED1: Measures "0.138in/3.505mm" at 449.22,-1741.92 h21.25 r90; Measures "0.11in/2.794mm" at 261.22,-1293.92 h21.25 r90; Measures "0.079in/2.007mm" at 261.22,-1393.92 h21.25 r90; Measures "0.08in/2.032mm" at 139.22,-1759.92 h21.25 r90; Measures "0.138in/3.505mm" at 39.22,-1741.92 h21.25 r90; Measures "Alt 2 Padstyle: OX90Y60D30P" at 837.22,-2165.92 h42.5 r90; Measures "Alt 1 Padstyle: OX60Y90D30P" at 763.22,-2165.92 h42.5 r90; Measures "2nd Padstyle: RX42Y77D0T" at 687.22,-2112.92 h42.5 r90; Measures "1st Padstyle: RX84Y77D0T" at 613.22,-2104.92 h42.5 r90; tDocu "*" at 274.22,-1664.92 h42.5 r90; tPlace "*" at 274.22,-1693.92 h42.5 r90
LED2: Measures "0.138in/3.505mm" at 646.07,-1741.92 h21.25 r90; Measures "0.11in/2.794mm" at 458.07,-1293.92 h21.25 r90; Measures "0.079in/2.007mm" at 458.07,-1393.92 h21.25 r90; Measures "0.08in/2.032mm" at 336.07,-1759.92 h21.25 r90; Measures "0.138in/3.505mm" at 236.07,-1741.92 h21.25 r90; Measures "Alt 2 Padstyle: OX90Y60D30P" at 1034.07,-2165.92 h42.5 r90; Measures "Alt 1 Padstyle: OX60Y90D30P" at 960.07,-2165.92 h42.5 r90; Measures "2nd Padstyle: RX42Y77D0T" at 884.07,-2112.92 h42.5 r90; Measures "1st Padstyle: RX84Y77D0T" at 810.07,-2104.92 h42.5 r90; tDocu "*" at 471.07,-1664.92 h42.5 r90; tPlace "*" at 471.07,-1693.92 h42.5 r90
LED3: Measures "0.138in/3.505mm" at 842.92,-1741.92 h21.25 r90; Measures "0.11in/2.794mm" at 654.92,-1293.92 h21.25 r90; Measures "0.079in/2.007mm" at 654.92,-1393.92 h21.25 r90; Measures "0.08in/2.032mm" at 532.92,-1759.92 h21.25 r90; Measures "0.138in/3.505mm" at 432.92,-1741.92 h21.25 r90; Measures "Alt 2 Padstyle: OX90Y60D30P" at 1230.92,-2165.92 h42.5 r90; Measures "Alt 1 Padstyle: OX60Y90D30P" at 1156.92,-2165.92 h42.5 r90; Measures "2nd Padstyle: RX42Y77D0T" at 1080.92,-2112.92 h42.5 r90; Measures "1st Padstyle: RX84Y77D0T" at 1006.92,-2104.92 h42.5 r90; tDocu "*" at 667.92,-1664.92 h42.5 r90; tPlace "*" at 667.92,-1693.92 h42.5 r90
LED4: Measures "0.138in/3.505mm" at 1039.77,-1741.92 h21.25 r90; Measures "0.11in/2.794mm" at 851.77,-1293.92 h21.25 r90; Measures "0.079in/2.007mm" at 851.77,-1393.92 h21.25 r90; Measures "0.08in/2.032mm" at 729.77,-1759.92 h21.25 r90; Measures "0.138in/3.505mm" at 629.77,-1741.92 h21.25 r90; Measures "Alt 2 Padstyle: OX90Y60D30P" at 1427.77,-2165.92 h42.5 r90; Measures "Alt 1 Padstyle: OX60Y90D30P" at 1353.77,-2165.92 h42.5 r90; Measures "2nd Padstyle: RX42Y77D0T" at 1277.77,-2112.92 h42.5 r90; Measures "1st Padstyle: RX84Y77D0T" at 1203.77,-2104.92 h42.5 r90; tDocu "*" at 864.77,-1664.92 h42.5 r90; tPlace "*" at 864.77,-1693.92 h42.5 r90
Q2: Measures "0.035in/0.889mm" at 366.03,-598.17 h21.25 r180; Measures "0.1in/2.54mm" at 575.03,-790.17 h21.25 r180; Measures "0.169in/4.293mm" at -124.97,-790.17 h21.25 r180; Measures "0.287in/7.29mm" at 229.03,-1056.17 h21.25 r180; Measures "0.173in/4.394mm" at 240.03,-982.17 h21.25 r180; Measures "Alt 2 Padstyle: OX90Y60D30P" at 664.03,-218.17 h42.5 r180; Measures "Alt 1 Padstyle: OX60Y90D30P" at 664.03,-278.17 h42.5 r180; Measures "Pin One Padstyle: RX51Y20D0T" at 694.03,-458.17 h42.5 r180; Measures "Default Padstyle: RX51Y20D0T" at 680.03,-518.17 h42.5 r180; tDocu "*" at 175.03,-834.17 h42.5 r180
Q3: Measures "0.13in/3.302mm" at 1290.03,-1007.17 h21.25; Measures "0.13in/3.302mm" at 1621.03,-809.17 h21.25; Measures "0.026in/0.65mm" at 959.03,-784.17 h21.25; Measures "0.018in/0.457mm" at 1222.03,-639.17 h21.25; Measures "0.132in/3.353mm" at 1279.03,-489.17 h21.25; Measures "Alt 2 Padstyle: OX90Y60D30P" at 855.03,-1472.17 h42.5; Measures "Alt 1 Padstyle: OX60Y90D30P" at 855.03,-1412.17 h42.5; Measures "Heat Tab Padstyle: RX63Y89D0T" at 802.03,-1292.17 h42.5; Measures "Default Padstyle: RX30Y13D0T" at 839.03,-1232.17 h42.5
TP1: Bottom 3D Body ">TP_SIGNAL_NAME" at 1084.03,-638.17 h33.46
U1: Measures "0.161in/4.089mm" at 1582.03,-664.17 h21.25 r90; Measures "0.161in/4.089mm" at 1340.03,-1053.17 h21.25 r90; Measures "0.161in/4.089mm" at 1340.03,-226.17 h21.25 r90; Measures "0.161in/4.089mm" at 1049.03,-664.17 h21.25 r90; Measures "0.02in/0.508mm" at 1124.03,-582.17 h21.25 r90; Measures "0.02in/0.5mm" at 1301.03,-301.17 h21.25 r90; Measures "Alt 2 Padstyle: b229_152h76" at 1966.03,-1088.17 h42.5 r90; Measures "Alt 1 Padstyle: b152_229h76" at 1906.03,-1088.17 h42.5 r90; Measures "Heat Tab Padstyle: r226_226" at 1786.03,-1096.17 h42.5 r90; Measures "Default Padstyle: r25_71" at 1726.03,-1013.17 h42.5 r90
U3: Measures "0.056in/1.422mm" at 1371.03,150.83 h21.25 r270; Measures "0.119in/3.023mm" at 1653.03,-188.17 h21.25 r270; Measures "0.019in/0.483mm" at 1553.03,-188.17 h21.25 r270; Measures "0.075in/1.905mm" at 1189.03,-188.17 h21.25 r270; Measures "0.018in/0.457mm" at 1411.03,-501.17 h21.25 r270; Measures "0.099in/2.515mm" at 1371.03,-577.17 h21.25 r270; Measures "Alt 2 Padstyle: OX90Y60D30P" at 837.03,235.83 h42.5 r270; Measures "Alt 1 Padstyle: OX60Y90D30P" at 911.03,235.83 h42.5 r270; Measures "Bottom Padstyle: RX23Y58D0T" at 987.03,235.83 h42.5 r270; Measures "Top Padstyle: RX23Y58D0T" at 1061.03,182.83 h42.5 r270
U4: Measures "0.056in/1.422mm" at 787.03,-925.17 h21.25; Measures "0.119in/3.023mm" at 1126.03,-643.17 h21.25; Measures "0.019in/0.483mm" at 1126.03,-743.17 h21.25; Measures "0.075in/1.905mm" at 1126.03,-1107.17 h21.25; Measures "0.018in/0.457mm" at 1439.03,-885.17 h21.25; Measures "0.099in/2.515mm" at 1515.03,-925.17 h21.25; Measures "Alt 2 Padstyle: OX90Y60D30P" at 702.03,-1459.17 h42.5; Measures "Alt 1 Padstyle: OX60Y90D30P" at 702.03,-1385.17 h42.5; Measures "Bottom Padstyle: RX23Y58D0T" at 702.03,-1309.17 h42.5; Measures "Top Padstyle: RX23Y58D0T" at 755.03,-1235.17 h42.5